# Altium PCB Controller.PcbDoc
Units mm, origin at the board's own origin, x right, y up, seen from the top; angles counter-clockwise.
Board outline 139.7 x 63.5 mm, 2 copper layers (Top Layer, Bottom Layer); 66 components, 40 nets, 280 pads, 58 vias.
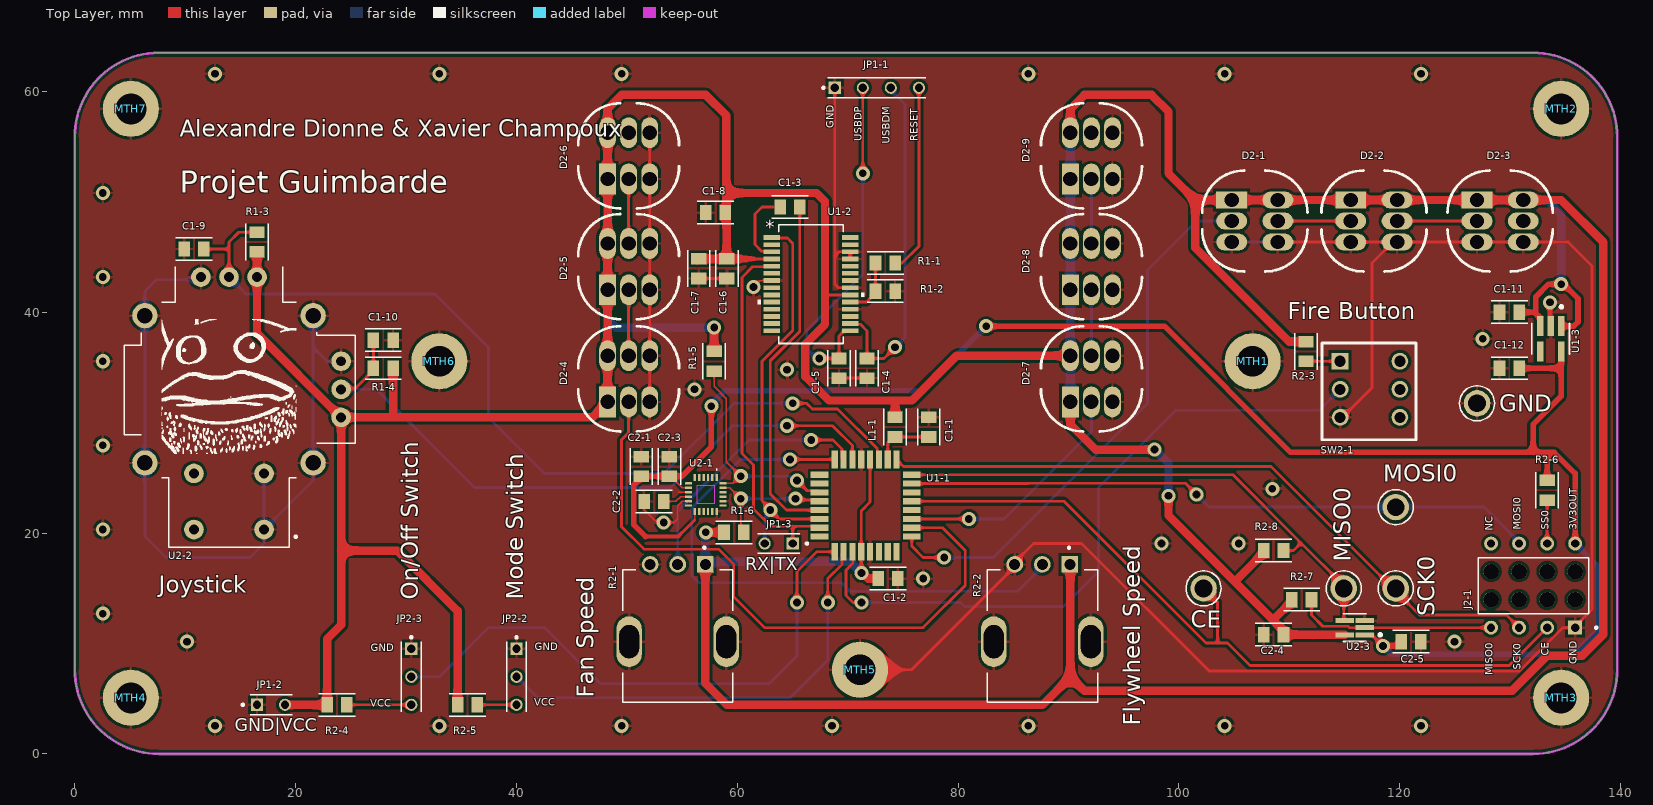
[diagram p0: Top Layer view]
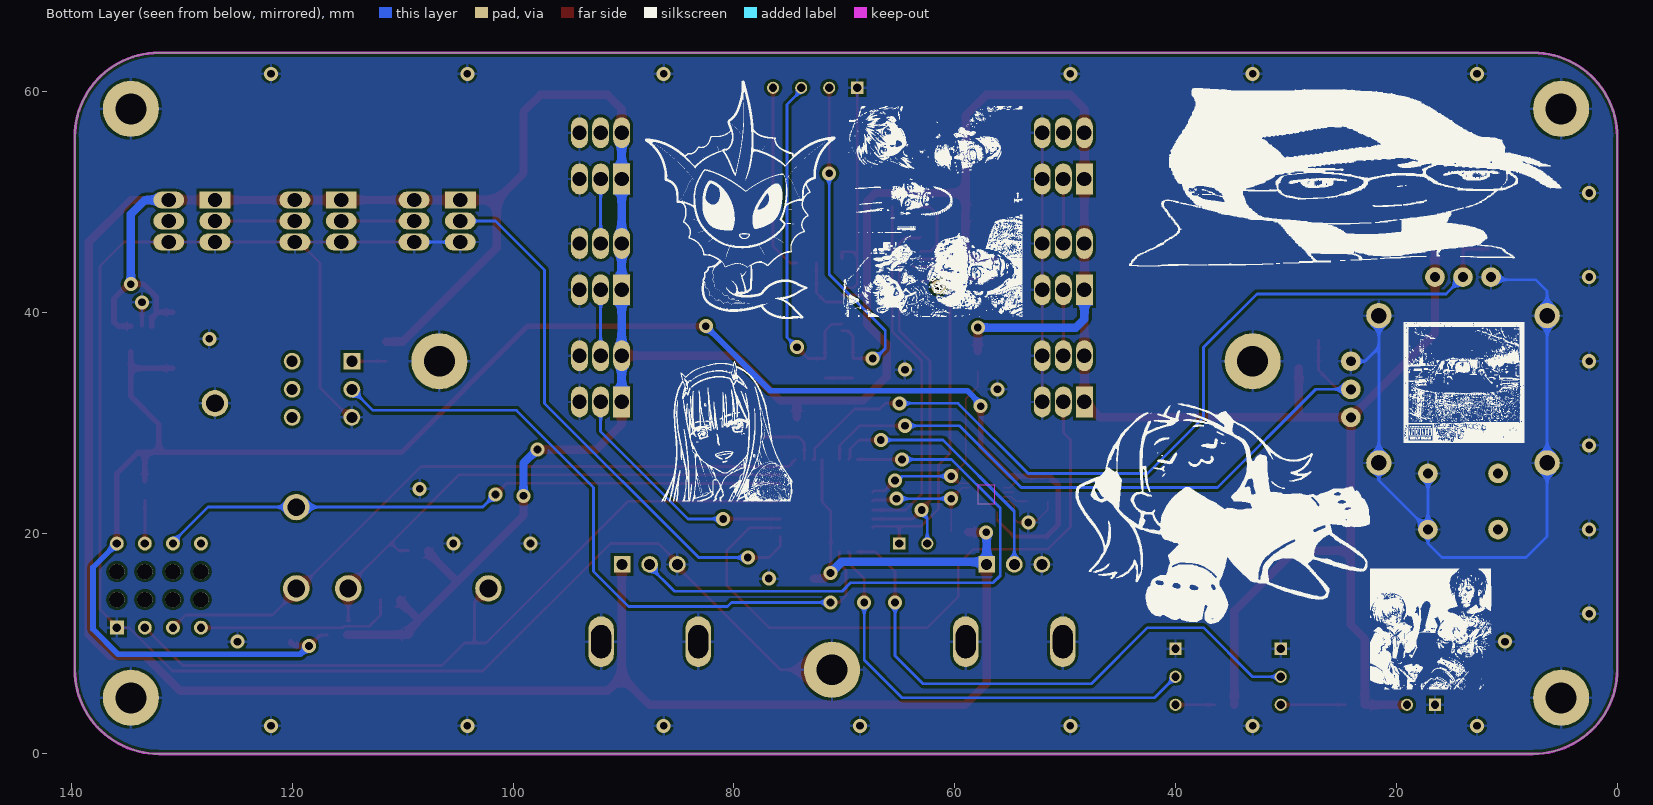
[diagram p1: Bottom Layer view, seen from below]
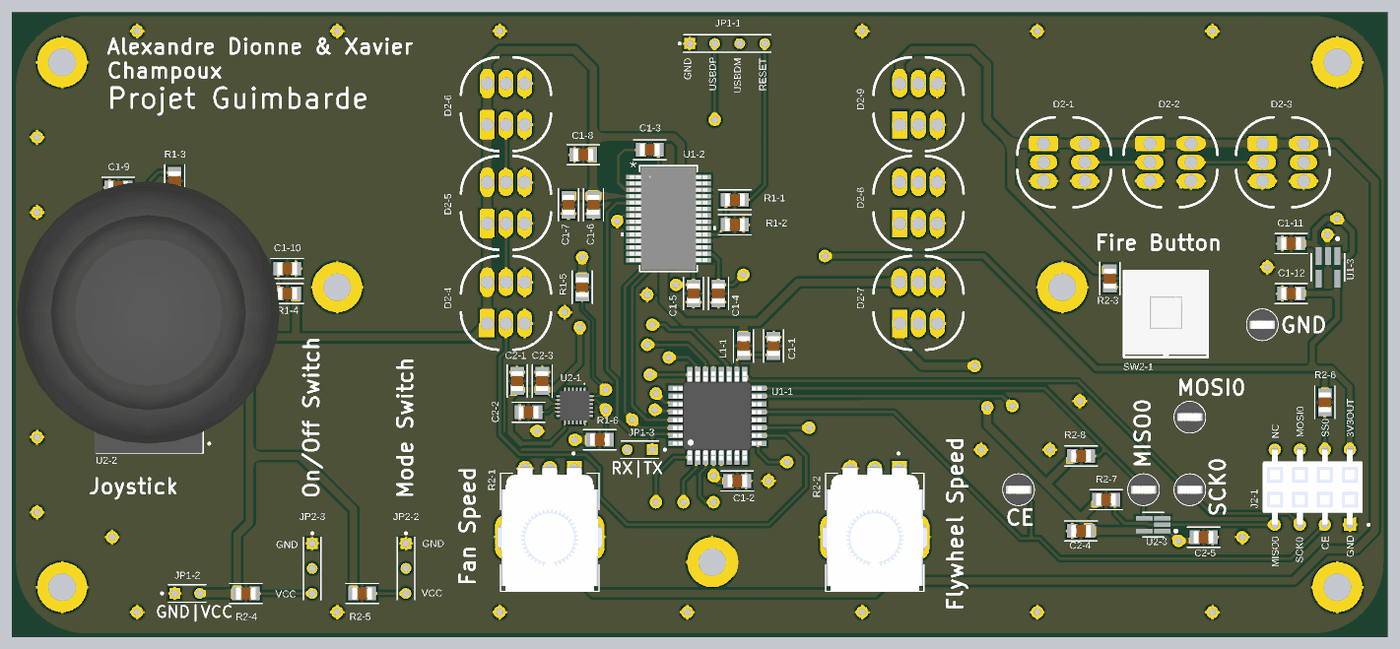
[diagram p2: 3D render of the assembled board from above, using the file's embedded part models]

## Layer stack, top to bottom
Top Solder: solder mask 0.0102, Solder Resist, Dk 3.5
Top Layer: signal copper 0.0356
Dielectric 1: dielectric 0.32, FR-4, Dk 4.8
Bottom Layer: signal copper 0.0356
Bottom Solder: solder mask 0.0102, Solder Resist, Dk 3.5

## Board outline
7.62,0 cw(c7.62,7.62) 0,7.62 0,55.88 cw(c7.62,55.88) 7.62,63.5 132.08,63.5 cw(c132.08,55.88) 139.7,55.88 139.7,7.62 cw(c132.08,7.62) 132.08,0

## Design rules (kind name [scope] priority, off if disabled: settings)
AssemblyTestPointUsage [All] p1: isadvanced=TRUE
AssemblyTestpoint [All] p1: isadvanced=TRUE testpointundercomponent=TRUE minsize=1.016 maxsize=2.54 preferedsize=1.524 minholesize=0 maxholesize=1.016 preferedholesize=0.813 testpointgrid=0.025 usegrid=TRUE gridtolerance=0 allowsidetop=TRUE allowsidebottom=TRUE
Clearance "Stitching GND" [IsStitchingVia and InNet('GND') vs (IsVia and (Not IsStitchingVia)) Or IsPad] p1: isadvanced=TRUE gap=0.127 ignorepadtopadclearanceinfootprint=FALSE
Clearance Clearance_1 [OnMid vs OnMid] p2: gap=0.254 ignorepadtopadclearanceinfootprint=FALSE except(0: Arc-Hole Track-Hole SMDPad-Hole THPad-Hole Via-Hole Fill-Hole Poly-Hole Region-Hole Text-Hole; 0.127: Arc-SMDPad Track-SMDPad SMDPad-SMDPad SMDPad-Text Fill-Fill Fill-Poly Fill-Region Poly-Poly Poly-Region Region-Region) sourcerule=56 cellrowname=All cellrowtype=0 cellcolname=All cellcoltype=0 innerlayers=TRUE
Clearance Clearance_2 [(ExistsOnLayer('Top Layer') Or ExistsOnLayer('Bottom Layer')) vs (ExistsOnLayer('Top Layer') Or ExistsOnLayer('Bottom Layer'))] p3: gap=0.254 ignorepadtopadclearanceinfootprint=FALSE except(0: Arc-Hole Track-Hole SMDPad-Hole THPad-Hole Via-Hole Fill-Hole Poly-Hole Region-Hole Text-Hole; 0.127: Arc-SMDPad Track-SMDPad SMDPad-SMDPad SMDPad-Text Fill-Fill Fill-Poly Fill-Region Poly-Poly Poly-Region Region-Region) sourcerule=56 cellrowname=All cellrowtype=0 cellcolname=All cellcoltype=0 outerlayers=TRUE
Clearance [All] p4: gap=0.254 ignorepadtopadclearanceinfootprint=FALSE except(0: Arc-Hole Track-Hole SMDPad-Hole THPad-Hole Via-Hole Fill-Hole Poly-Hole Region-Hole Text-Hole) ismatrix=TRUE
ComponentClearance [All] p1: isadvanced=TRUE gap=0.254 collisioncheckmode=3 verticalgap=0.254 showdistances=FALSE
FabricationTestPointUsage [All] p1: isadvanced=TRUE valid=0 allowmultiple=FALSE
FabricationTestpoint [All] p1: isadvanced=TRUE side=3 testpointundercomponent=TRUE minsize=1.016 maxsize=2.54 preferedsize=1.524 minholesize=0 maxholesize=1.016 preferedholesize=0.813 testpointgrid=0.025 allowsidetop=TRUE allowsidebottom=TRUE usegrid=TRUE gridtolerance=0
FanoutControl Fanout_BGA [IsBGA] p1: isadvanced=TRUE bgadir=Out bgaviamode=Centered fanoutstyle=Auto fanoutdirection=Alternating viagrid=0.025 // Fanout_BGA (Default Rule)
FanoutControl Fanout_LCC [IsLCC] p2: isadvanced=TRUE bgadir=Out bgaviamode=Centered fanoutstyle=Auto fanoutdirection=Alternating viagrid=0.025 // Fanout_LCC (Default Rule)
FanoutControl Fanout_SOIC [IsSOIC] p3: isadvanced=TRUE bgadir=Out bgaviamode=Centered fanoutstyle=Auto fanoutdirection=Alternating viagrid=0.025 // Fanout_SOIC (Default Rule)
FanoutControl Fanout_Small [(CompPinCount < 5)] p4: isadvanced=TRUE bgadir=Out bgaviamode=Centered fanoutstyle=Auto fanoutdirection=OutThenIn viagrid=0.025 // Fanout_Small (Default Rule)
FanoutControl Fanout_Default [All] p5: isadvanced=TRUE bgadir=Out bgaviamode=Centered fanoutstyle=Auto fanoutdirection=Alternating viagrid=0.025 // Fanout_Default (Default Rule)
Height [All] p1: isadvanced=TRUE minheight=0 maxheight=30.48 prefheight=12.7
HoleSize [All] p1: isadvanced=TRUE absolutevalues=TRUE maxlimit=3.048 minlimit=0.025 maxpercent=80.000 minpercent=20.000
HoleToHoleClearance [All] p1: isadvanced=TRUE gap=0.254 allowstackedmicrovias=TRUE
LayerPairs [All] p1: isadvanced=TRUE enforce=TRUE
MinimumSolderMaskSliver [All] p1: isadvanced=TRUE minsoldermaskwidth=0.102
NetAntennae [All] p1: isadvanced=TRUE netantennaetolerance=0
PasteMaskExpansion [All] p1: isadvanced=TRUE expansion=0
PlaneClearance [All] p1: isadvanced=TRUE clearance=0.508
PlaneConnect [All] p1: isadvanced=TRUE planeconnectstyle=Relief reliefexpansion=0.508 reliefentries=4 reliefconductorwidth=0.254 reliefairgap=0.254
PolygonConnect [All] p1: connectstyle=Relief reliefconductorwidth=0.254 reliefentries=4 polygonreliefangle="90 Angle" airgapwidth=0.254
RoutingCorners [All] p1: isadvanced=TRUE cornerstyle=45-Degree minsetback=2.54 maxsetback=2.54
RoutingPriority [All] p1: isadvanced=TRUE routingpriority=0
RoutingVias [All] p1: holewidth=0.711 width=1.27 viastyle="Through Hole" minholewidth=0.711 minwidth=1.27 maxholewidth=0.711 maxwidth=1.27
ShortCircuit [All] p1: isadvanced=TRUE allowed=FALSE
SilkToSilkClearance [All] p1: isadvanced=TRUE silktosilkclearance=0.127
SilkToSolderMaskClearance [IsPad] p1: isadvanced=TRUE minsilkscreentomaskgap=0.152 clearancetoexposedcopper=TRUE
SolderMaskExpansion [All] p1: isadvanced=TRUE expansion=0.102 istentingtop=FALSE
SupplyNets "Schematic Supply Nets_17" [InNet('GND')] p1: isadvanced=TRUE voltage=0.000
SupplyNets "Schematic Supply Nets_16" [InNet('3V3')] p2: isadvanced=TRUE voltage=0.000
SupplyNets "Schematic Supply Nets_15" [InNet('VCC')] p3: isadvanced=TRUE voltage=0.000
SupplyNets "Schematic Supply Nets_14" [InNet('VCC')] p4: isadvanced=TRUE voltage=0.000
SupplyNets "Schematic Supply Nets_13" [InNet('GND')] p5: isadvanced=TRUE voltage=0.000
SupplyNets "Schematic Supply Nets_12" [InNet('3V3')] p6: isadvanced=TRUE voltage=0.000
SupplyNets "Schematic Supply Nets_11" [InNet('VCC')] p7: isadvanced=TRUE voltage=0.000
SupplyNets "Schematic Supply Nets_10" [InNet('GND')] p8: isadvanced=TRUE voltage=0.000
SupplyNets "Schematic Supply Nets_9" [InNet('GND')] p9: isadvanced=TRUE voltage=0.000
SupplyNets "Schematic Supply Nets_8" [InNet('VCC')] p10: isadvanced=TRUE voltage=0.000
SupplyNets "Schematic Supply Nets_7" [InNet('GND')] p11: isadvanced=TRUE voltage=0.000
SupplyNets "Schematic Supply Nets_6" [InNet('VCC')] p12: isadvanced=TRUE voltage=0.000
SupplyNets "Schematic Supply Nets_5" [InNet('GND')] p13: isadvanced=TRUE voltage=0.000
SupplyNets "Schematic Supply Nets_4" [InNet('VCC')] p14: isadvanced=TRUE voltage=0.000
SupplyNets "Schematic Supply Nets_3" [InNet('GND')] p15: isadvanced=TRUE voltage=0.000
SupplyNets "Schematic Supply Nets_2" [InNet('VCC')] p16: isadvanced=TRUE voltage=0.000
SupplyNets "Schematic Supply Nets_1" [InNet('GND')] p17: isadvanced=TRUE voltage=0.000
SupplyNets "Schematic Supply Nets" [InNet('VCC')] p18: isadvanced=TRUE voltage=0.000
UnRoutedNet [All] p1: isadvanced=TRUE
UnpouredPolygon [All] p1: isadvanced=TRUE
Width MaxMinWidth_1 [All] p1: isadvanced=TRUE maxlimit=0.762 minlimit=0.127 preferedwidth=0.254 minimp=50.000000 maximp=50.000000 favimp=50.000000
Width [All] p2: maxlimit=0.254 minlimit=0.254 preferedwidth=0.254
4 further rules are at their usual default settings.

## Classes and differential pairs
component class KJTurretCommand_Processing: C1-1 C1-2 C1-3 C1-4 C1-5 C1-6 C1-7 C1-8 C1-9 C1-10 C1-11 C1-12 JP1-1 JP1-2 JP1-3 L1-1 MTH1 MTH2 MTH3 MTH4 MTH5 MTH6 MTH7 R1-1 R1-2 R1-3 R1-4 R1-5 R1-6 U1-1 U1-2 U1-3
component class KJTurretCommand_Accessories: C2-1 C2-2 C2-3 C2-4 C2-5 CE D2-1 D2-2 D2-3 D2-4 D2-5 D2-6 D2-7 D2-8 D2-9 GND J2-1 JP2-2 JP2-3 MISO0 MOSI0 R2-1 R2-2 R2-3 R2-4 R2-5 R2-6 R2-7 R2-8 SCK0 SW2-1 U2-1 U2-2 U2-3

## Components (designator, comment, footprint, x,y, rotation, side; value= is the part's Value field where it differs from the comment)
C1-1 "100nF" 0805_SMD 77.343,29.59 r90 top
C1-2 "100nF" 0805_SMD 73.66,15.875 r0 top
C1-3 "100nF" 0805_SMD 64.77,49.53 r0 top
C1-4 "47pF" 0805_SMD 71.755,34.925 r270 top
C1-5 "47pF" 0805_SMD 69.215,34.925 r270 top
C1-6 "100nF" 0805_SMD 59.055,43.942 r270 top
C1-7 "100nF" 0805_SMD 56.515,43.942 r270 top
C1-8 "4700nF" 0805_SMD 58.023,49.022 r180 top
C1-9 "47pF" 0805_SMD 10.795,45.72 r180 top
C1-10 "47pF" 0805_SMD 27.94,37.465 r0 top
C1-11 "100nF" 0805_SMD 129.922,40.005 r180 top
C1-12 "100nF" 0805_SMD 129.921,34.925 r180 top
C2-1 "100nF" 0805_SMD 51.308,26.035 r90 top
C2-2 "100nF" 0805_SMD 52.45,22.86 r180 top
C2-3 "100nF" 0805_SMD 53.848,26.035 r90 top
C2-4 "100nF" 0805_SMD 108.585,10.795 r180 top
C2-5 "100nF" 0805_SMD 121.032,10.16 r0 top
CE "TestPoint" TESTPOINT 102.235,14.986 r0 top (schematic designator TP4)
D2-1 "NeoPixel" NEOPIXEL 104.775,50.165 r0 top
D2-2 "NeoPixel" NEOPIXEL 115.57,50.165 r0 top
D2-3 "NeoPixel" NEOPIXEL 127,50.165 r0 top
D2-4 "NeoPixel" NEOPIXEL 48.26,31.877 r90 top
D2-5 "NeoPixel" NEOPIXEL 48.26,42.037 r90 top
D2-6 "NeoPixel" NEOPIXEL 48.26,52.07 r90 top
D2-7 "NeoPixel" NEOPIXEL 90.17,31.877 r90 top
D2-8 "NeoPixel" NEOPIXEL 90.17,42.037 r90 top
D2-9 "NeoPixel" NEOPIXEL 90.17,52.07 r90 top
GND "TestPoint" TESTPOINT 127,31.75 r0 top (schematic designator TP5)
J2-1 "Female Header bottom entry 2x4" "HEADER 2X4 BOTTOM ENTRY" 129.54,15.24 r0 top
JP1-1 "HEADER 4" "HEADER 4" 68.834,60.325 r0 top
JP1-2 "Header 2" "HEADER 2" 16.51,4.445 r0 top
JP1-3 "Header 2" "HEADER 2" 65.024,19.05 r180 top
JP2-2 "HEADER 3" "HEADER 3" 40.005,9.525 r270 top
JP2-3 "HEADER 3" "HEADER 3" 30.48,9.525 r270 top
L1-1 "10uH" 0805_SMD 74.295,29.591 r270 top
MISO0 "TestPoint" TESTPOINT 114.935,14.986 r0 top (schematic designator TP1)
MOSI0 "TestPoint" TESTPOINT 119.634,22.352 r0 top (schematic designator TP2)
MTH1 "ANTENNA" MOUNTINGHOLE 106.68,35.56 r0 top
MTH2 "ANTENNA" MOUNTINGHOLE 134.62,58.42 r0 top
MTH3 "ANTENNA" MOUNTINGHOLE 134.62,5.08 r0 top
MTH4 "ANTENNA" MOUNTINGHOLE 5.08,5.08 r0 top
MTH5 "ANTENNA" MOUNTINGHOLE 71.12,7.62 r0 top
MTH6 "ANTENNA" MOUNTINGHOLE 33.02,35.56 r0 top
MTH7 "ANTENNA" MOUNTINGHOLE 5.08,58.42 r0 top
R1-1 "4k7" 0805_SMD 73.407,44.45 r180 top
R1-2 "10k" 0805_SMD 73.406,41.91 r0 top
R1-3 "4k7" 0805_SMD 16.51,46.355 r90 top
R1-4 "4k7" 0805_SMD 27.94,34.925 r180 top
R1-5 "4k7" 0805_SMD 57.912,35.56 r270 top
R1-6 "4k7" 0805_SMD 59.69,20.066 r0 top
R2-1 "Pot 10k" POTENTIOMETER 54.61,10.16 r180 top
R2-2 "Pot 10k" POTENTIOMETER 87.63,10.16 r180 top
R2-3 "4k7" 0805_SMD 111.506,36.449 r90 top
R2-4 "1k" 0805_SMD 23.749,4.445 r180 top
R2-5 "1k" 0805_SMD 35.56,4.445 r180 top
R2-6 "4k7" 0805_SMD 133.35,23.876 r90 top
R2-7 "4k7" 0805_SMD 111.125,13.97 r180 top
R2-8 "4k7" 0805_SMD 108.585,18.415 r180 top
SCK0 "TestPoint" TESTPOINT 119.634,14.986 r0 top (schematic designator TP3)
SW2-1 "TL2202" TL2202 114.605,35.56 r0 top
U1-1 "ATMEGA328PB-AU" ATMEGA328PB-AU 71.628,22.479 r90 top
U1-2 "FT232RNL" FT232RNL 66.675,42.545 r0 top
U1-3 "3V3 regulator linear" "3V3 REGULATOR LINEAR" 133.67,37.585 r270 top
U2-1 "ICM-20648" ICM-20648 57.15,23.495 r270 top
U2-2 "Joystick" JOYSTICK 13.97,33.02 r180 top
U2-3 "SN74LXC1T14DCKR" TRANSLATOR 115.926,11.43 r180 top

## Footprints (in the part's own frame and the unit in brackets; to place one, negate y for a bottom-side part, rotate by r counter-clockwise, add the part's x,y. Pads: shape width x height; smd on the part's side, far side on the other; paste and mask are expansions set on the pad)
"3V3 REGULATOR LINEAR" [mm]
  rect 1.805x0.612 smd paste+0 mask+0: 1(-1.15,0.95) 2(-1.15,0) 3(-1.15,-0.95) 4(1.15,-0.95) 5(1.15,0.95)
  silkscreen extent -3.03,-1.7 1.4,1.7
0805_SMD [mm]
  rect 1.05x1.38 smd: 1(-0.888,0) 2(0.888,0)
  silkscreen extent -1.65,-1.02 1.65,1.02, body extent -1,-0.63 1,0.63, height 1.35
ATMEGA328PB-AU [mm]
  rect 1.6x0.55 smd mask+0.064: 1(-4.18,2.8) 2(-4.18,2) 3(-4.18,1.2) 4(-4.18,0.4) 5(-4.18,-0.4) 6(-4.18,-1.2) 7(-4.18,-2) 8(-4.18,-2.8) 17(4.18,-2.8) 18(4.18,-2) 19(4.18,-1.2) 20(4.18,-0.4) 21(4.18,0.4) 22(4.18,1.2) 23(4.18,2) 24(4.18,2.8)
  rect 0.55x1.6 smd mask+0.064: 9(-2.8,-4.18) 10(-2,-4.18) 11(-1.2,-4.18) 12(-0.4,-4.18) 13(0.4,-4.18) 14(1.2,-4.18) 15(2,-4.18) 16(2.8,-4.18) 25(2.8,4.18) 26(2,4.18) 27(1.2,4.18) 28(0.4,4.18) 29(-0.4,4.18) 30(-1.2,4.18) 31(-2,4.18) 32(-2.8,4.18)
  body extent -4.5,-4.5 4.5,4.5, height 1.2
FT232RNL [mil]
  rect 59.5x17 smd paste+0 mask+0: 1(-139.75,166.34) 2(-139.75,140.75) 3(-139.75,115.16) 4(-139.75,89.57) 5(-139.75,63.98) 6(-139.75,38.39) 7(-139.75,12.8) 8(-139.75,-12.8) 9(-139.75,-38.39) 10(-139.75,-63.98) 11(-139.75,-89.57) 12(-139.75,-115.16) 13(-139.75,-140.75) 14(-139.75,-166.34) 15(139.75,-166.34) 16(139.75,-140.75) 17(139.75,-115.16) 18(139.75,-89.57) 19(139.75,-63.98) 20(139.75,-38.39) 21(139.75,-12.8) 22(139.75,12.8) 23(139.75,38.39) 24(139.75,63.98) 25(139.75,89.57) 26(139.75,115.16) 27(139.75,140.75) 28(139.75,166.34)
  silkscreen extent -190,-212 190,212, body extent -156,-206 156,206, height 79
"HEADER 2" [mm]
  rect 1.1x1.1 / inner round 1.1 / far side rect 1.1x1.1 hole 0.75: 01(0,0)
  round 1.1 hole 0.75: 02(2.54,0)
  silkscreen extent -1.38,-0.89 3.17,0.89
"HEADER 2X4 BOTTOM ENTRY" [mm]
  rect 1.258x1.258 / inner round 1.258 / far side rect 1.258x1.258 hole 0.75: 1(6.35,-3.81)
  round 1.258 hole 0.75: 2(6.35,3.81) 3(3.81,-3.81) 4(3.81,3.81) 5(1.27,-3.81) 6(1.27,3.81) 7(-1.27,-3.81) 8(-1.27,3.81)
  round 1.4 hole 1.4 unplated: ""(-1.27,-1.27) ""(-1.27,1.27) ""(1.27,-1.27) ""(1.27,1.27) ""(3.81,-1.27) ""(3.81,1.27) ""(6.35,-1.27) ""(6.35,1.27)
  silkscreen extent -2.41,-3.91 8.35,2.54, body extent -2.5,-3.91 7.58,3.91, height 7.13
"HEADER 3" [mm]
  rect 1.1x1.1 / inner round 1.1 / far side rect 1.1x1.1 hole 0.75: 1(0,0)
  round 1.1 hole 0.75: 2(2.54,0) 3(5.08,0)
  silkscreen extent -1.13,-0.89 5.71,0.89
"HEADER 4" [mm]
  rect 1.1x1.1 / inner round 1.1 / far side rect 1.1x1.1 hole 0.75: 1(0,0)
  round 1.1 hole 0.75: 2(2.54,0) 3(5.08,0) 4(7.62,0)
  silkscreen extent -1.13,-0.89 8.25,0.89
ICM-20648 [mm]
  rrect25% 0.64x0.22 smd: 1(-1.545,1) 2(-1.545,0.6) 3(-1.545,0.2) 4(-1.545,-0.2) 5(-1.545,-0.6) 6(-1.545,-1) 13(1.545,-1) 14(1.545,-0.6) 15(1.545,-0.2) 16(1.545,0.2) 17(1.545,0.6) 18(1.545,1)
  rrect25% 0.22x0.64 smd: 7(-1,-1.545) 8(-0.6,-1.545) 9(-0.2,-1.545) 10(0.2,-1.545) 11(0.6,-1.545) 12(1,-1.545) 19(1,1.545) 20(0.6,1.545) 21(0.2,1.545) 22(-0.2,1.545) 23(-0.6,1.545) 24(-1,1.545)
  Top Layer keep-out region: 0.85,-0.77 -0.85,-0.77 -0.85,0.77 0.85,0.77
  Keep-Out Layer region: 0.85,-0.77 -0.85,-0.77 -0.85,0.77 0.85,0.77
  silkscreen extent -2.31,0.94 -2.21,1.04, body extent -1.5,-1.5 1.5,1.5, height 0.93
JOYSTICK [mil]
  round 70 hole 35.43: B1A(-125,500) B1B(125,500) B2A(-125,300) B2B(125,300) H1(-100,-400) H2(0,-400) H3(100,-400) V1(-400,100) V2(-400,0) V3(-400,-100)
  round 90 hole 55.12: S1(-300,262.5) S2(-300,-262.5) S3(300,-262.5) S4(300,262.5)
  silkscreen extent -450,-437 374,563, body extent -520,-523 530,564, height 1190
MOUNTINGHOLE [mm]
  round 5.08 hole 2.8: 1(0,0)
NEOPIXEL [mil]
  rect 110x60 / inner rect 100x60 / far side rect 110x60 hole 51.18: 1(0,0)
  oval 110x60 / inner oval 100x60 / far side oval 110x60 hole 51.18: 2(0,-75) 3(0,-150) 4(165,-150) 5(165,-75) 6(165,0)
  silkscreen extent -105,-255 270,105
POTENTIOMETER [mm]
  rect 1.508x1.508 / inner round 1.508 / far side rect 1.508x1.508 hole 1: 1(-2.5,-7)
  round 1.508 hole 1: 2(0,-7) 3(2.5,-7)
  oval 2.3x4.6 hole 1.8 slot 3 at 90 deg: S1(-4.4,0) S2(4.4,0)
  silkscreen extent -5,-8.61 5,5.5, body extent -5.64,-7.08 5.64,5.57, height 18.6
TESTPOINT [mm]
  round 2.4 hole 1.6: TP(0,0)
  silkscreen extent -1.59,-1.59 1.59,1.59, body extent -1.59,-1.59 1.59,1.59, height 5.59
TL2202 [mil]
  rect 60x60 hole 39.37: 1(0,0)
  round 60 hole 39.37: 2(0,-100) 3(0,-200) 4(213,-200) 5(213,-100) 6(213,0)
  silkscreen extent -65,-280 270,65, body extent -65,-281 270,65, height 560
TRANSLATOR [mm]
  rect 1.677x0.452 smd paste+0 mask+0: 1(-0.914,0.65) 2(-0.914,0) 3(-0.914,-0.65) 4(0.914,-0.65) 5(0.914,0.65)
  silkscreen extent -2.43,-1.25 1.05,1.25

## Part data
C1-1 C1-2 C1-3 C1-4 C1-5 C1-6 C1-7 C1-9 C1-10 C1-11 C1-12 C2-1 C2-2 C2-3 C2-4 C2-5: library part "CAP NP"
C1-8: library part CAP
CE GND MISO0 MOSI0 SCK0: Package="NON STANDARD-1 Keystone", Check_prices=https://www.snapeda.com/parts/5006/Keystone/view-part/?ref=eda, MF="Keystone Electronics Corp.", MP=5006, SnapEDA_Link=https://www.snapeda.com/parts/5006/Keystone/view-part/?ref=snap
J2-1 JP1-2 JP1-3 U2-2: Package=None, Price=None
  J2-1: Availability="In Stock", Check_prices=https://www.snapeda.com/parts/71991-306LF/Amphenol/view-part/?ref=eda, MF=Amphenol, MP=71991-306LF, Purchase-URL=https://pricing.snapeda.com/search?q=71991-306LF&ref=eda, SnapEDA_Link=https://www.snapeda.com/parts/71991-306LF/Amphenol/view-part/?ref=snap
  JP1-2 JP1-3: Availability=Unavailable, MP=GRPB021VWVN-RC
  U2-2: Availability=Unavailable, MP=COM-09032
L1-1: library part INDUCTOR
R1-1 R1-2 R1-3 R1-4 R1-5 R1-6 R2-3 R2-4 R2-5 R2-6 R2-7 R2-8: library part R
R2-1 R2-2: library part "Potentiometer knob", Package=None, Availability=Unavailable, MP=PT01-D120K2-B103, Price=None
U1-1: Package="TQFP-32 Microchip", Check_prices=https://www.snapeda.com/parts/ATMEGA328PB-AU/Microchip/view-part/?ref=eda, MF=Microchip, MP=ATMEGA328PB-AU, SnapEDA_Link=https://www.snapeda.com/parts/ATMEGA328PB-AU/Microchip/view-part/?ref=snap
U1-2: Mfr_Name="FTDI, Future Technology Devices International Ltd", RefDes=RefDes, Type=Type
U1-3: "No Description Available", Mfr_Name="Texas Instruments", RefDes=RefDes, Type=TYPE
U2-1: Package="QFN-24 InvenSense", Availability=Unavailable, MF="TDK InvenSense", MP=ICM-20648, Price=None, SnapEDA_Link=https://www.snapeda.com/parts/ICM-20648/TDK%20InvenSense/view-part/474513/?ref=snap
U2-3: Mfr_Name="Texas Instruments", RefDes=RefDes, Type=TYPE

## Via types
v1: diameter 1.27, hole 0.7, Top Layer to Bottom Layer, 58 vias

## Nets (pads, with @x,y where several pads share a name; then routed paths per layer and width w, separated by ;. In a path a pad name is that pad's centre, name@x,y a point inside that pad or via, vN(x,y) a via of type N, cw(c..) or ccw(c..) an arc to the next point about the centre after c; other vN are vias at no path point)
3V3: C1-12.1 C2-1.1 C2-3.1 C2-5.1 J2-1.2 R2-6.2 U1-3.5 U2-1.8 U2-1.13 U2-3.1 | length 168.3
  Top Layer w0.127: 52.324,25.121 52.324,25.147 ; C2-3.1 C2-3.1@54.013,25.147 ; C2-3.1@54.077,25.147 C2-3.1@54.013,25.147 ; U2-1.8 55.577,24.122 55.038,24.122 C2-3.1@54.013,25.147 ; 56.15,21.175 U2-1.13
  Top Layer w0.254: 54.66,19.685 56.15,21.175 ; U2-3.1 117.452,10.78 v1@118.453,9.779
  Top Layer w0.381: 51.689,19.685 54.66,19.685
  Top Layer w0.508: 51.689,19.685 50.609,20.764 50.609,24.322 51.435,25.147 52.324,25.147 C2-3.1@53.746,25.147 ; C2-3.1@54.077,25.147 54.992,25.147 57.658,27.813 v1(57.658,31.496) ; v1(82.55,38.735) 98.679,38.735 110.109,27.305 132.08,27.305 ; v1@118.453,9.779 v1(118.491,9.779) 119.763,9.779 C2-5.1 C2-5.1@120.144,9.995 ; C1-12.1 134.62,34.925 ; R2-6.2 133.35,27.305 ; U1-3.5 134.62,34.925 ; J2-1.2 135.89,25.4 133.985,27.305 133.35,27.305 ; 132.08,27.305 133.35,27.305 ; 132.08,27.305 132.08,29.845 134.62,32.385 134.62,34.925
  Bottom Layer w0.508: v1(57.658,31.496) 57.658,31.702 58.849,32.893 76.708,32.893 v1(82.55,38.735) ; v1(118.491,9.779) 119.253,9.017 135.763,9.017 138.049,11.303 138.049,16.891 J2-1.2
3V3MISO0: J2-1.7 R2-7.1 U2-3.2 | length 18.1
  Top Layer w0.254: R2-7.1 112.013,12.574 113.03,11.557 115.314,11.557 115.441,11.43 U2-3.2 J2-1.7
CE: CE.TP J2-1.3 U1-1.13 | length 70.4
  Top Layer w0.254: U1-1.13 89.599,22.879 102.445,10.033 103.505,10.033 ; CE.TP 103.505,13.716 103.505,10.033 ; J2-1.3@133.35,10.969 132.889,10.969 129.921,8.001 106.426,8.001 104.394,10.033 103.505,10.033
FAN_KNOB: R2-1.2 U1-1.23 | length 23.7
  Top Layer w0.254: v1(66.698,28.426) 68.675,28.426 69.484,27.617 69.484,26.803 U1-1.23
  Bottom Layer w0.254: R2-1.2 54.61,21.971 61.065,28.426 v1(66.698,28.426)
Fire_Button: SW2-1.2 U1-1.3 | length 62
  Top Layer w0.254: U1-1.3 70.456,18.271 70.456,17.243 69.85,16.637 69.85,14.351 70.485,13.716 v1(71.247,13.716)
  Bottom Layer w0.254: v1(71.247,13.716) 80.211,13.716 80.592,13.335 89.535,13.335 92.71,16.51 92.71,24.13 99.695,31.115 112.7,31.115 SW2-1.2
FLYWHEEL_KNOB: R2-2.2 U1-1.24 | length 54.4
  Top Layer w0.254: v1(64.77,26.67) 68.817,26.67 U1-1.24
  Bottom Layer w0.254: v1(64.77,26.67) 60.285,26.67 55.88,22.265 55.88,16.137 56.523,15.494 69.429,15.494 70.191,14.732 85.392,14.732 87.63,16.97 R2-2.2
GND: C1-1.2 C1-2.2 C1-4.2 C1-5.2 C1-6.2 C1-7.2 C1-8.2 C1-9.2 C1-10.2 C1-11.2 C1-12.2 C2-1.2 C2-2.2 C2-3.2 C2-4.2 C2-5.2 D2-1.3 D2-1.4 D2-2.3 D2-2.4 D2-3.3 D2-3.4 D2-4.3 D2-4.4 D2-5.3 D2-5.4 D2-6.3 D2-6.4 D2-7.3 D2-7.4 D2-8.3 D2-8.4 D2-9.3 D2-9.4 GND.TP J2-1.1 JP1-1.1 JP1-2.01 JP2-2.1 JP2-3.1 MTH1.1 MTH2.1 MTH3.1 MTH4.1 MTH5.1 MTH6.1 MTH7.1 R1-2.2 R2-1.3 R2-1.S1 R2-1.S2 R2-2.3 R2-2.S1 R2-2.S2 SW2-1.3 U1-1.5 U1-1.21 U1-2.7 U1-2.18 U1-2.21 U1-2.25 U1-2.26 U1-3.2 U2-1.9 U2-1.11 U2-1.18 U2-1.20 U2-2.B1A U2-2.B2A U2-2.H3 U2-2.S1 U2-2.S2 U2-2.S3 U2-2.S4 U2-2.V3 U2-3.3 | length 295.3
  Top Layer w0.127: C2-2.2 51.562,22.098 52.514,21.145 53.149,21.145 v1(53.34,20.955) 54.25,20.955 54.61,21.315 54.61,22.479 55.026,22.895 U2-1.11 ; 54.664,23.695 U2-1.9 ; v1(61.468,42.291) 61.477,42.291 62.056,42.87 U1-2.7 ; U1-3.2@133.604,38.801 U1-3.2
  Top Layer w0.254: D2-4.3 D2-4.4 D2-5.3 D2-5.4 D2-6.3 D2-6.4 ; C1-7.2 C1-6.2 ; JP1-1.1 68.834,45.085 ; C1-5.2 C1-4.2 ; U1-2.21 69.159,42.22 68.834,42.545 68.834,45.085 ; U1-2.25 U1-2.26 69.219,45.47 68.834,45.085 ; MTH5.1 75.78,7.62 85.13,16.97 R2-2.3 85.13,17.351 86.829,19.05 91.186,19.05 102.743,7.493 130.841,7.493 134.778,11.43 J2-1.1 135.89,11.557 137.414,13.081 137.414,44.196 135.255,46.355 D2-3.4 D2-3.3 D2-2.4 D2-2.4@119.38,46.355 ; D2-1.4 D2-2.3 D2-2.4@119.38,46.355 ; SW2-1.3 114.795,30.48 117.475,33.16 117.475,44.45 D2-2.4@119.38,46.355
  Top Layer w0.381: U1-3.2@133.604,38.801 v1(133.604,40.894)
  Bottom Layer w0.254: U2-2.H3 11.198,42.948 7.388,42.948 6.35,41.91 U2-2.S3 U2-2.S4 6.35,19.685 8.255,17.78 15.875,17.78 17.145,19.05 U2-2.B1A ; U2-2.B2A U2-2.B1A ; U2-2.S2 21.59,36.83 ; U2-2.V3 22.86,35.56 21.59,36.83 ; D2-4.4 D2-4.4@52.07,36.957 ; D2-1.3 D2-1.4 ; U2-2.B1A 21.59,24.765 U2-2.S1 21.59,36.83
  other v1: 12.7,2.54 33.02,2.54 49.53,2.54 68.58,2.54 86.36,2.54 104.14,2.54 121.92,2.54 10.16,10.16 124.968,10.16 2.54,12.7 76.835,15.875 98.425,19.05 105.41,19.05 2.54,20.32 108.458,24.003 2.54,27.94 56.134,33.02 64.516,34.798 2.54,35.56 127.508,37.592 2.54,43.18 2.54,50.8 12.7,61.595 33.02,61.595 49.53,61.595 86.36,61.595 104.14,61.595 121.92,61.595
Joystick_Horizontal: C1-9.1 R1-3.2 U1-1.19 U2-2.H2 | length 83.6
  Top Layer w0.254: C1-9.1 13.97,45.72 ; U2-2.H2 13.97,45.72 ; R1-3.2 14.858,47.243 13.97,46.355 13.97,45.72 ; v1(65.024,31.75) 66.294,31.75 66.802,31.242 69.088,31.242 72.684,27.646 72.684,26.659 U1-1.19
  Bottom Layer w0.254: U2-2.H2 15.494,41.656 32.639,41.656 37.465,36.83 37.465,30.48 42.545,25.4 53.34,25.4 59.69,31.75 v1(65.024,31.75)
Joystick_Vertical: C1-10.1 R1-4.2 U1-1.22 U2-2.V2 | length 60.6
  Top Layer w0.254: U2-2.V2 24.218,33.108 25.4,33.108 27.052,34.76 R1-4.2 C1-10.1 ; v1(64.516,29.718) 68.624,29.718 70.428,27.914 U1-1.22
  Bottom Layer w0.254: U2-2.V2 27.305,33.02 36.195,24.13 53.975,24.13 59.563,29.718 v1(64.516,29.718)
MISO0: MISO0.TP R2-8.1 U1-1.16 U2-3.4 | length 48.6
  Top Layer w0.254: U1-1.16 104.896,25.279 111.061,19.113 ; R2-8.1 110.363,18.415 111.061,19.113 ; U2-3.4@114.793,12.08 U2-3.4 114.935,12.158 MISO0.TP 114.935,15.24 111.061,19.113
MODE_SW: JP2-2.2 U1-1.2 | length 40.8
  Top Layer w0.254: v1(68.199,13.716) 68.199,15.875 69.48,17.156 69.48,18.151 U1-1.2
  Bottom Layer w0.254: JP2-2.2 41.91,5.08 64.77,5.08 68.199,8.509 v1(68.199,13.716)
MOSI0: J2-1.6 MOSI0.TP U1-1.15 | length 57.4
  Top Layer w0.254: U1-1.15 86.377,24.479 86.409,24.511 100.584,24.511 v1(101.6,23.495)
  Bottom Layer w0.254: v1(101.6,23.495) 102.743,22.352 120.142,22.352 121.412,22.352 127.635,22.352 130.81,19.177 J2-1.6
NEO_FAN: D2-7.2 U1-1.11 | length 22.2
  Top Layer w0.254: U1-1.11 v1(80.969,21.279)
  Bottom Layer w0.254: v1(80.969,21.279) 84.144,21.279 92.075,29.21 D2-7.2
NEO_FIRE: D2-1.2 U1-1.9 | length 50
  Top Layer w0.254: U1-1.9 75.811,19.682 75.811,18.804 76.835,17.78 v1(78.74,17.78)
  Bottom Layer w0.254: v1(78.74,17.78) 83.185,17.78 97.155,31.75 97.155,43.815 101.6,48.26 D2-1.2
NEO_FLY: D2-4.2 U1-1.10 | length 57.2
  Top Layer w0.254: 50.165,30.48 50.165,29.083 49.53,28.448 49.53,20.574 51.562,18.542 58.293,18.542 59.69,17.145 59.69,14.224 62.484,11.43 76.835,11.43 80.645,15.24 80.645,18.415 78.581,20.479 U1-1.10
NetC1-1_1: C1-1.1 L1-1.2 U1-1.18 | length 5.5
  Top Layer w0.254: U1-1.18 73.628,28.201 74.13,28.703 L1-1.2 L1-1.2 C1-1.1
NetC1-3_1: C1-3.1 U1-2.3 | length 6.5
  Top Layer w0.254: U1-2.3 63.072,45.523 62.212,45.523 61.595,46.14 61.595,48.895 62.23,49.53 63.247,49.53
NetC1-4_1: C1-4.1 JP1-1.3 U1-2.16 | length 32.1
  Top Layer w0.254: U1-2.16 70.278,38.917 71.138,38.917 71.755,38.3 C1-4.1 C1-4.1 73.279,35.814 v1(74.295,36.83) ; JP1-1.3@73.66,60.325 JP1-1.3@73.66,60.706
  Bottom Layer w0.254: JP1-1.3@73.66,60.325 75.184,58.801 75.184,37.719 v1(74.295,36.83)
NetC1-5_1: C1-5.1 JP1-1.2 U1-2.15 | length 32.4
  Top Layer w0.254: v1(67.437,35.814) C1-5.1 C1-5.1 69.215,37.85 69.685,38.32 U1-2.15 ; JP1-1.2@71.12,60.325 71.374,60.071 v1(71.374,52.578)
  Bottom Layer w0.254: v1(67.437,35.814) 67.183,35.814 66.294,36.703 66.294,38.354 71.374,43.434 v1(71.374,52.578)
NetC2-2_1: C2-2.1 U2-1.10 | length 2.4
  Top Layer w0.127: C2-2.1 54.452,22.86 54.887,23.295 U2-1.10
NetD2-1_5: D2-1.5 D2-2.2 | length 6.6
  Top Layer w0.254: D2-1.5 D2-2.2
NetD2-2_5: D2-2.5 D2-3.2 | length 7.2
  Top Layer w0.254: D2-2.5 D2-3.2
NetD2-4_5: D2-4.5 D2-5.2 | length 6
  Top Layer w0.254: D2-4.5 D2-5.2
NetD2-5_5: D2-5.5 D2-6.2 | length 5.8
  Top Layer w0.254: D2-5.5 D2-6.2
NetD2-7_5: D2-7.5 D2-8.2 | length 6.3
  Bottom Layer w0.254: D2-7.5 D2-8.2@92.075,42.418
NetD2-8_5: D2-8.5 D2-9.2 | length 6
  Bottom Layer w0.254: D2-8.5@92.075,46.609 D2-9.2@92.075,52.578
NetJ2-1_4: J2-1.4 R2-6.1 | length 3.9
  Top Layer w0.254: J2-1.4 R2-6.1
NetJP1-1_4: JP1-1.4 R1-1.1 | length 17.2
  Top Layer w0.254: R1-1.1 74.93,44.45 76.454,45.974 76.454,60.071 JP1-1.4@76.2,60.325
NetJP2-2_3: JP2-2.3 R2-5.1 | length 3.6
  Top Layer w0.254: R2-5.1 JP2-2.3
NetJP2-3_3: JP2-3.3 R2-4.1 | length 5.8
  Top Layer w0.254: R2-4.1 JP2-3.3
NetR1-1_2: R1-1.2 R1-2.1 U1-2.19 | length 5.3
  Top Layer w0.254: U1-2.19 71.693,40.92 72.518,41.745 R1-2.1 72.518,44.449 R1-1.2
NetR2-3_1: R2-3.1 SW2-1.1 | length 3.1
  Top Layer w0.254: R2-3.1 R2-3.1 SW2-1.1
PWR_SW: JP2-3.2 U1-1.1 | length 51.7
  Top Layer w0.254: v1(65.405,13.716) 65.405,16.51 67.194,18.299 U1-1.1
  Bottom Layer w0.254: JP2-3.2 33.02,6.985 37.465,11.43 42.545,11.43 47.625,6.35 62.865,6.35 65.405,8.89 v1(65.405,13.716)
RESET: C1-3.2 U1-1.29 | length 32.2
  Top Layer w0.254: C1-3.2 65.658,38.27 62.992,35.604 62.992,23.535 64.448,22.079 U1-1.29
RXD: JP1-3.02 U1-1.30 U1-2.1 | length 35.8
  Top Layer w0.254: U1-2.1 63.178,46.717 64.535,46.717 65.024,46.228 65.024,38.354 62.23,35.56 62.23,22.952 62.992,22.19 v1(62.992,22.098) 62.992,22.076 63.789,21.279 U1-1.30
  Bottom Layer w0.254: JP1-3.02 62.484,21.315 62.992,21.823 v1(62.992,22.098)
SCK0: J2-1.5 SCK0.TP U1-1.17 | length 62.7
  Top Layer w0.254: U1-1.17 75.052,26.035 108.331,26.035 121.793,12.573 129.667,12.573 J2-1.5
SCL0: R1-6.2 U1-1.28 U2-1.23 | length 12.3
  Top Layer w0.127: U2-1.23 59.344,24.095 v1(60.325,23.114) 60.325,20.067 R1-6.2@60.324,20.066
  Top Layer w0.254: v1(65.278,23.114) 65.396,22.996 67.331,22.996 U1-1.28
  Bottom Layer w0.254: v1(60.325,23.114) v1(65.278,23.114)
SDA0: R1-5.2 U1-1.27 U2-1.24 | length 20.2
  Top Layer w0.127: R1-5.2 57.912,33.274 59.009,32.177 59.009,26.462 v1(60.325,25.146) 60.243,25.146 59.592,24.495 U2-1.24
  Top Layer w0.254: v1(65.405,24.765) 66.343,23.827 67.3,23.827 U1-1.27
  Bottom Layer w0.254: v1(60.325,25.146) 64.749,25.146 65.13,24.765 v1(65.405,24.765)
TXD: JP1-3.01 U1-1.31 U1-2.5 | length 32.9
  Top Layer w0.254: U1-2.5 63.072,44.117 61.389,44.117 60.427,43.155 60.427,27.203 61.468,26.162 61.468,22.185 63.03,20.623 65.024,20.623 ; U1-2.5@63.707,44.117 U1-2.5@63.76,44.17 ; JP1-3.01 65.024,20.623 ; U1-1.31 67.304,20.623 65.024,20.623
VCC: C1-2.1 C1-6.1 C1-7.1 C1-8.1 C1-11.1 C2-4.1 D2-1.1 D2-1.6 D2-2.1 D2-2.6 D2-3.1 D2-3.6 D2-4.1 D2-4.6 D2-5.1 D2-5.6 D2-6.1 D2-6.6 D2-7.1 D2-7.6 D2-8.1 D2-8.6 D2-9.1 D2-9.6 JP1-2.02 L1-1.1 R1-3.1 R1-4.1 R1-5.1 R1-6.1 R2-1.1 R2-2.1 R2-3.2 R2-4.2 R2-5.2 R2-7.2 R2-8.2 U1-1.4 U1-1.20 U1-2.4 U1-2.20 U1-3.1 U1-3.3 U2-2.H1 U2-2.V1 U2-3.5 | length 573.2
  Top Layer w0.254: 61.783,44.82 U1-2.4 ; 67.945,41.529 67.989,41.573 U1-2.20@70.222,41.573 ; v1@71.358,16.383 v1(71.247,16.383) 71.238,16.392 71.238,18.29 U1-1.4 71.228,22.005 72.028,22.805 U1-1.20 ; 74.295,31.877 74.422,32.004
  Top Layer w0.381: 61.214,44.831 61.595,44.831
  Top Layer w0.508: 60.833,44.831 61.214,44.831 ; C1-11.1 132.334,40.005 ; U1-3.3 132.72,39.492 132.334,39.878 132.334,40.005 ; U1-3.1 135.763,38.735 136.144,39.116 136.144,41.227 134.826,42.545 v1(134.62,42.545) 133.477,42.545 132.334,41.402 132.334,40.005
  Top Layer w0.635: 60.325,44.831 60.833,44.831
  Top Layer w0.762: R1-3.1 U2-2.H1 16.51,38.1 U2-2.V1 ; JP1-2.02 R2-4.2 22.861,10.415 24.13,11.684 24.13,18.415 ; R1-4.1 28.828,30.733 28.575,30.48 ; R2-5.2 34.672,12.953 29.21,18.415 24.13,18.415 ; C1-7.1@56.371,44.686 C1-7.1 C1-6.1 ; R2-1.1 57.11,6.39 59.055,4.445 87.63,4.445 90.17,6.985 ; v1(57.15,20.066) R1-6.1 ; R1-5.1 v1(57.912,38.608) ; 60.325,44.831 C1-6.1 C1-6.1 ; v1@71.358,16.383 71.866,15.875 C1-2.1 ; L1-1.1 74.295,31.877 ; R2-2.1 90.17,17.12 90.17,6.985 ; D2-7.1 90.17,29.845 92.456,27.559 v1(97.79,27.559) ; D2-7.6 79.884,36.068 75.82,32.004 74.422,32.004 68.326,32.004 66.167,34.163 66.167,36.34 66.168,36.341 66.168,37.125 67.945,38.902 67.945,41.529 67.945,50.038 67.183,50.8 59.023,50.8 ; D2-9.6@90.17,56.769 90.17,58.42 91.44,59.69 97.536,59.69 99.06,58.166 99.06,52.578 101.473,50.165 ; v1(99.06,23.368) 99.06,21.59 105.029,15.621 ; R2-8.2 107.697,18.25 105.068,15.621 105.029,15.621 ; R2-7.2 110.237,13.805 108.585,12.153 108.585,12.065 ; R2-3.2 109.983,37.337 101.473,45.847 101.473,50.165 ; U2-3.5 114.3,10.78 114.285,10.795 C2-4.1 109.473,11.177 108.585,12.065 ; 24.13,18.415 U2-2.V1 ; U2-2.V1 28.575,30.48 ; 28.575,30.48 46.863,30.48 D2-4.1 D2-4.6 D2-5.1 D2-5.6 D2-6.1 D2-6.6 48.26,58.42 49.53,59.69 57.15,59.69 59.023,57.817 59.023,50.8 ; 59.023,50.8 59.023,49.022 59.039,49.006 59.039,44.846 C1-6.1 ; 90.17,6.985 91.44,5.715 130.175,5.715 133.35,8.89 136.525,8.89 138.43,10.795 138.43,46.355 134.62,50.165 D2-3.6 D2-3.1 D2-2.6 D2-2.1 D2-1.6 D2-1.1 101.473,50.165 ; 105.029,15.621 108.585,12.065
  Bottom Layer w0.254: D2-5.6 D2-5.6@48.26,46.863
  Bottom Layer w0.762: D2-5.1 48.26,39.37 49.022,38.608 v1(57.912,38.608) ; D2-6.6@48.26,55.245 D2-6.6 ; v1@56.896,20.066 56.896,19.929 57.11,19.715 R2-1.1 ; R2-1.1@57.491,17.399 70.231,17.399 v1(71.247,16.383) ; D2-7.1 D2-7.6 D2-8.1 D2-8.6 D2-9.1 D2-9.6 D2-9.6@90.17,56.769 ; v1(97.79,27.559) 97.812,27.581 99.06,26.333 v1(99.06,23.368) ; D2-3.6 133.35,50.165 134.62,48.895 v1(134.62,42.545)
pads on no net: D2-3.5 D2-6.5 D2-9.5 J2-1. J2-1.8 SW2-1.4 SW2-1.5 SW2-1.6 U1-1.6 U1-1.7 U1-1.8 U1-1.12 U1-1.14 U1-1.25 U1-1.26 U1-1.32 U1-2.2 U1-2.6 U1-2.8 U1-2.9 U1-2.10 U1-2.11 U1-2.12 U1-2.13 U1-2.14 U1-2.17 U1-2.22 U1-2.23 U1-2.24 U1-2.27 U1-2.28 U1-3.4 U2-1.1 U2-1.2 U2-1.3 U2-1.4 U2-1.5 U2-1.6 U2-1.7 U2-1.12 U2-1.14 U2-1.15 U2-1.16 U2-1.17 U2-1.19 U2-1.21 U2-1.22 U2-2.B1B U2-2.B2B

## Polygon pours and split planes (outlines as drawn)
GND on Top Layer "GND_TOP" (solid, remove dead copper, pour order 0): 0,0 139.7,0 139.7,63.5 0,63.5
GND on Bottom Layer "GND_BOT" (solid, remove dead copper, pour order 2): 0,0 139.7,0 139.7,63.5 0,63.5

## Keep-outs
Keep-Out Layer:
  the board outline again, w0.254

## Silkscreen, mask and mechanical layers (free items; w line width, h text height)
Top Overlay:
  drawing of 130 lines, arcs and shapes, not listed
  text "GND" at 68.961,56.642 h1.14 r90
  text "Alexandre Dionne & Xavier Champoux" at 9.525,55.88 h1.52
  text "USBDP" at 71.501,55.499 h1.14 r90
  text "RESET" at 76.581,55.499 h1.14 r90
  text "USBDM" at 74.041,55.245 h1.14 r90
  text "Projet Guimbarde" at 9.525,50.8 h2.03
  text "Fire Button" at 109.855,39.37 h1.52
  text "MOSI0" at 131.191,20.32 h1.14 r90
  text "SS0" at 133.731,20.32 h1.14 r90
  text "3V3OUT" at 136.271,20.32 h1.14 r90
  text "NC" at 128.651,20.193 h1.14 r90
  text "RX|TX" at 60.706,16.637 h1.14
  text "Joystick" at 7.62,14.605 h1.52
  text "On/Off Switch" at 31.115,13.97 h1.52 r90
  text "Mode Switch" at 40.64,13.97 h1.52 r90
  text "GND" at 41.643,9.171 h1.14
  text "GND" at 26.8,9.072 h1.14
  text "CE" at 133.731,8.89 h1.14 r90
  text "GND" at 136.271,8.128 h1.14 r90
  text "SCK0" at 131.204,7.62 h1.14 r90
  text "MISO0" at 128.651,7.112 h1.14 r90
  text "Fan Speed" at 46.99,5.08 h1.52 r90
  text "VCC" at 41.597,4.141 h1.14
  text "VCC" at 26.743,4.048 h1.14
  text "Flywheel Speed" at 96.52,2.54 h1.52 r90
  text "GND|VCC" at 14.478,2.032 h1.14
Bottom Overlay:
  drawing of 4736 lines, arcs and shapes, not listed
Mechanical 13:
  the board outline again, w0.254

## Text inside footprints (layer, text, board x,y; h text height)
U1-2: Top Overlay "*" at 62.554,47.075 h1.27